# Altium PCB DT10966_MOTOR_CONTROLLER.PcbDoc (part 2 of 8)
Units mm, origin at the board's own origin, x right, y up, seen from the top; angles counter-clockwise.
Board outline 300 x 19 mm, 10 copper layers (Top Layer, Layer 2 GND, Layer 3 SIG, Layer 4 GND, Layer 5 PWR, Layer 6 PWR, Layer 7 GND, Layer 8 SIG, Layer 9 GND, Bottom Layer), stack 2.418 mm thick; 745 components, 446 nets, 2132 pads, 1222 vias.
Unrouted connection lines stored in the file: 3.
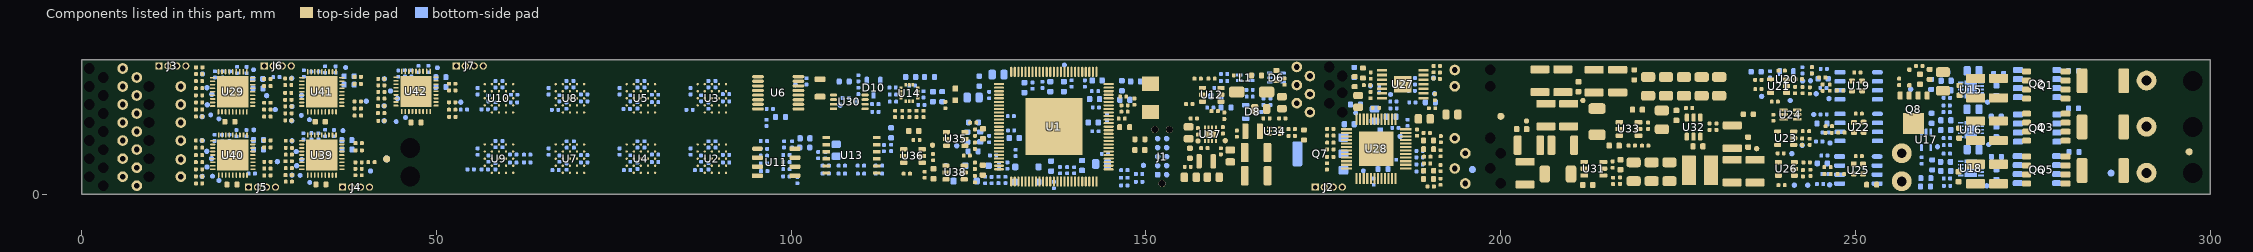
[diagram p10: the components of this part, seen from the top]

## Components (designator, comment, footprint, x,y, rotation, side; value= is the part's Value field where it differs from the comment) (continued)
TP9 "Test Point" TP_D0.75mm 243.641,16.009 r0 bottom
TP10 "Test Point" TP_D0.75mm 246.236,13.494 r90 bottom
TP11 "Test Point" TP_D0.75mm 242.528,15.974 r0 bottom
TP12 "Test Point" TP_D0.75mm 236.753,13.805 r0 bottom
TP13 "Test Point" TP_D0.75mm 244.096,11.257 r270 bottom
TP14 "Test Point" TP_D0.75mm 240.784,13.229 r270 bottom
TP15 "Test Point" TP_D0.75mm 246.377,7.227 r90 bottom
TP16 "Test Point" TP_D0.75mm 242.472,6.913 r270 bottom
TP17 "Test Point" TP_D0.75mm 241.013,5.741 r0 bottom
TP18 "Test Point" TP_D0.75mm 243.24,1.289 r270 bottom
TP19 "Test Point" TP_D0.75mm 246.34,1.348 r90 bottom
TP20 "Test Point" TP_D0.75mm 241.366,1.296 r270 bottom
TP21 "Test Point" TP_D0.75mm 190.517,16.387 r180 bottom
TP22 "Test Point" TP_D0.75mm 190.66,14.183 r180 bottom
TP23 "Test Point" TP_D1.5mm 184.465,14.074 r90 bottom
TP24 "Test Point" TP_D0.75mm 185.817,8.17 r90 bottom
TP27 "Test Point" TP_D0.75mm 181.627,15.312 r90 bottom
TP28 "Test Point" TP_D1.5mm 24.246,17.562 r180 bottom
TP29 "Test Point" TP_D0.75mm 18.357,14.091 r180 bottom
TP30 "Test Point" TP_D0.75mm 17.673,15.034 r180 bottom
TP31 "Test Point" TP_D0.75mm 17,10.958 r180 bottom
TP32 "Test Point" TP_D0.75mm 17.72,12.624 r180 bottom
TP35 "Test Point" TP_D0.75mm 17.041,16.958 r180 bottom
TP36 "Test Point" TP_D1.5mm 18.203,11.204 r180 bottom
TP37 "Test Point" TP_D1.5mm 19.359,10.639 r180 bottom
TP38 "Test Point" TP_D0.75mm 109.189,13.056 r90 bottom
TP39 "Test Point" TP_D0.75mm 106.913,12.575 r90 bottom
TP40 "Test Point" TP_D0.75mm 257.757,14.807 r270 bottom
TP41 "Test Point" TP_D0.75mm 203.621,10.342 r270 top
TP42 "Test Point" TP_D0.75mm 236.05,6.445 r90 top
TP43 "Test Point" TP_D0.75mm 211.56,13.228 r270 top
TP44 "Test Point" TP_D0.75mm 161.171,7.574 r90 top
TP45 "Test Point" TP_D0.75mm 123.327,6.843 r90 bottom
TP46 "Test Point" TP_D0.75mm 119.924,6.933 r90 top
TP47 "Test Point" TP_D0.75mm 157.335,7.521 r180 top
TP48 "Test Point" TP_D0.75mm 121.802,4.049 r90 bottom
TP49 "Test Point" TP_D1.5mm 36.834,8.982 r180 bottom
TP50 "Test Point" TP_D0.75mm 31.037,4.917 r180 bottom
TP51 "Test Point" TP_D0.75mm 30.26,6.032 r180 bottom
TP52 "Test Point" TP_D0.75mm 29.658,2.712 r180 bottom
TP53 "Test Point" TP_D0.75mm 30.306,4.037 r180 bottom
TP56 "Test Point" TP_D0.75mm 29.653,7.555 r180 bottom
TP57 "Test Point" TP_D1.5mm 30.797,2.674 r180 bottom
TP58 "Test Point" TP_D1.5mm 32.154,1.687 r180 bottom
TP59 "Test Point" TP_D0.75mm 166.549,14.662 r270 bottom
TP60 "Test Point" TP_D1.5mm 24.269,9.092 r0 bottom
TP61 "Test Point" TP_D0.75mm 18.325,5.041 r0 bottom
TP62 "Test Point" TP_D0.75mm 17.644,6.07 r0 bottom
TP63 "Test Point" TP_D0.75mm 16.991,2.533 r0 bottom
TP64 "Test Point" TP_D0.75mm 17.673,3.868 r0 bottom
TP67 "Test Point" TP_D0.75mm 17.004,7.581 r0 bottom
TP68 "Test Point" TP_D1.5mm 18.462,2.565 r0 bottom
TP69 "Test Point" TP_D1.5mm 19.36,1.946 r0 bottom
TP70 "Test Point" TP_D1.5mm 37.21,17.886 r180 bottom
TP71 "Test Point" TP_D0.75mm 31.003,13.961 r180 bottom
TP72 "Test Point" TP_D0.75mm 26.077,13.916 r180 bottom
TP73 "Test Point" TP_D0.75mm 29.61,10.379 r180 bottom
TP74 "Test Point" TP_D0.75mm 29.658,12.382 r180 bottom
TP77 "Test Point" TP_D0.75mm 29.61,16.363 r180 bottom
TP78 "Test Point" TP_D1.5mm 30.964,11.14 r180 bottom
TP79 "Test Point" TP_D1.5mm 32.11,10.527 r180 bottom
TP80 "Test Point" TP_D1.5mm 50.138,17.842 r180 bottom
TP81 "Test Point" TP_D0.75mm 44.525,13.507 r180 bottom
TP82 "Test Point" TP_D0.75mm 43.546,14.562 r180 bottom
TP83 "Test Point" TP_D0.75mm 42.643,10.367 r180 bottom
TP84 "Test Point" TP_D0.75mm 42.643,12.469 r180 bottom
TP87 "Test Point" TP_D0.75mm 42.67,16.275 r180 bottom
TP88 "Test Point" TP_D1.5mm 44.339,10.25 r180 bottom
TP89 "Test Point" TP_D1.5mm 45.646,10.827 r180 bottom
TP90 "Test Point" TP_D1.5mm 180.618,3.313 r90 bottom
TP91 "Test Point" TP_D1.5mm 179.544,11.478 r90 bottom
TP92 "Test Point" TP_D0.75mm 27.295,11.949 r180 bottom
TP93 "Test Point" TP_D0.75mm 40.724,3.297 r180 bottom
TP94 "Test Point" TP_D0.75mm 27.59,4.614 r0 bottom
TP95 "Test Point" TP_D0.75mm 40.126,13.135 r180 bottom
TP96 "Test Point" TP_D0.75mm 53.44,12.997 r180 bottom
U1 "TMS320F28377S-Q1" "100-HTQFP (14x14)" 137.011,9.537 r0 top
U2 "MT25QL01GBBB8E12-0AUT" "24-T-PBGA (6X8)" 88.821,5.038 r90 top
U3 "MT25QL01GBBB8E12-0AUT" "24-T-PBGA (6X8)" 88.821,13.537 r90 top
U4 "MT25QL01GBBB8E12-0AUT" "24-T-PBGA (6X8)" 78.821,5.037 r90 top
U5 "MT25QL01GBBB8E12-0AUT" "24-T-PBGA (6X8)" 78.821,13.537 r90 top
U6 "SN74LVC138AMPWTEP" TSSOP16 98.171,14.312 r180 top
U7 "MT25QL01GBBB8E12-0AUT" "24-T-PBGA (6X8)" 68.821,5.037 r90 top
U8 "MT25QL01GBBB8E12-0AUT" "24-T-PBGA (6X8)" 68.821,13.537 r90 top
U9 "MT25QL01GBBB8E12-0AUT" "24-T-PBGA (6X8)" 58.821,5.037 r90 top
U10 "MT25QL01GBBB8E12-0AUT" "24-T-PBGA (6X8)" 58.821,13.537 r90 top
U11 "25LC256-H/SN" SOIC8P127_490X600X175L70X41 97.871,4.537 r0 top
U12 "TMP127EDBVRQ1" SOT-23-6 159.268,14.033 r0 top
U13 "SCA3100-D07-1" SCA3100-D07-1 108.515,5.503 r0 top
U14 "ADXL382-2BCCZ-RL7" "14-LGA (2.9X2.8)" 116.653,14.285 r0 top
U15 "A89500KEJSR" A89500KEJSR 266.227,14.774 r180 bottom
U16 "A89500KEJSR" A89500KEJSR 266.227,9.102 r180 bottom
U17 "SN74LVC1G02DCKR" DCK0005A_N 259.929,7.695 r270 bottom
U18 "A89500KEJSR" A89500KEJSR 266.227,3.666 r180 bottom
U19 "INA240A1EDRQ1" SOIC8P127_490X600X175L70X41 250.426,15.302 r180 bottom
U20 "REF 3.3V" SOT-23 240.271,16.233 r270 bottom
U21 "TLV3201AIDBVR" SOP5P95_290X280X145L45X40 239.144,15.253 r180 top
U22 "INA240A1EDRQ1" SOIC8P127_490X600X175L70X41 250.439,9.438 r180 bottom
U23 "TLV3201AIDBVR" SOP5P95_290X280X145L45X40 240.145,7.919 r180 top
U24 "SN74LVC1G332DCKR" SC70-6 239.843,11.889 r0 top
U25 "INA240A1EDRQ1" SOIC8P127_490X600X175L70X41 250.396,3.429 r180 bottom
U26 "TLV3201AIDBVR" SOP5P95_290X280X145L45X40 240.236,3.589 r180 top
U27 "ALM2403QPWPRQ1" 14-HTSSOP 186.174,15.52 r0 top
U28 "PGA970QPHPR" "48-HTQFP (7x7)" 182.432,6.42 r180 top
U29 "PGA900ARHHR" 36VQFN 21.295,14.449 r270 top
U30 "PCA8565TS/1,118" MINISOIC-8 108.188,13.034 r0 top
U31 "LMR51635XDDCR" DDC0006A-MFG 213.102,3.624 r180 top
U32 "LMR51635XDDCR" DDC0006A-MFG 227.165,9.487 r270 top
U33 "LMR51635XDDCR" DDC0006A-MFG 218.048,9.214 r180 top
U34 "TPS564247DRLR" SOT5x3-6_DRL_TEX 168.152,8.908 r0 top
U35 "OPA320SAIDBVR" SOT-23-6 123.182,7.808 r0 top
U36 "REF35300QDBVRQ1" SOT23-6_DBV_TEX 117.171,5.409 r0 top
U37 "TPS62080ADSGR" "WSON (8) 2*2mm" 159.085,8.471 r270 top
U38 "OPA320SAIDBVR" SOT-23-6 123.096,3.084 r0 top
U39 "PGA900ARHHR" 36VQFN 33.862,5.537 r270 top
U40 "PGA900ARHHR" 36VQFN 21.321,5.537 r270 top
U41 "PGA900ARHHR" 36VQFN 33.862,14.449 r270 top
U42 "PGA900ARHHR" 36VQFN 47.13,14.515 r270 top
X1 "PIN-TH-0.6mm" PIN-TH-0.6mm#1 193.5,17.528 r0 top
X2 "PIN-TH-0.6mm" PIN-TH-0.6mm#1 193.5,15.226 r0 top
X3 "PIN-TH-0.6mm" PIN-TH-0.6mm#2 193.5,1.528 r0 top
X4 "PIN-TH-0.6mm" PIN-TH-0.6mm#1 193.5,3.653 r0 top
X5 "PIN-TH-0.6mm" PIN-TH-0.6mm#2 193.5,5.778 r0 top
X6 "PIN-TH-0.6mm" PIN-TH-0.6mm#1 193.5,7.903 r0 top
X7 "PIN-TH-0.6mm" PIN-TH-0.6mm#1 171.253,17.955 r90 top
X8 "PIN-TH-0.6mm" PIN-TH-0.6mm#1 171.253,15.401 r90 top
X9 "PIN-TH-0.6mm" PIN-TH-0.6mm#1 171.253,12.861 r90 top
X10 "PIN-TH-0.6mm" PIN-TH-0.6mm#1 173.1,11.591 r180 top
X11 "PIN-TH-0.6mm" PIN-TH-0.6mm#1 5.79,15.201 r0 top
X12 "PIN-TH-0.6mm" PIN-TH-0.6mm#1 5.79,17.741 r90 top
X13 "PIN-TH-0.6mm" PIN-TH-0.6mm#1 5.79,10.121 r90 top
X14 "PIN-TH-0.6mm" PIN-TH-0.6mm#1 5.79,12.661 r90 top
X15 "PIN-TH-0.6mm" PIN-TH-0.6mm#1 5.79,5.041 r90 top
X16 "PIN-TH-0.6mm" PIN-TH-0.6mm#3 5.79,8.125 r90 top
X17 "PIN-TH-0.6mm" PIN-TH-0.6mm#1 14,4.913 r90 top
X18 "PIN-TH-0.6mm" PIN-TH-0.6mm#1 5.79,2.501 r90 top
X19 "PIN-TH-0.6mm" PIN-TH-0.6mm#1 7.79,13.931 r90 top
X20 "PIN-TH-0.6mm" PIN-TH-0.6mm#1 7.79,16.471 r90 top
X21 "PIN-TH-0.6mm" PIN-TH-0.6mm#1 7.79,8.851 r90 top
X22 "PIN-TH-0.6mm" PIN-TH-0.6mm#1 7.79,11.391 r90 top
X23 "PIN-TH-0.6mm" PIN-TH-0.6mm#1 7.79,3.771 r90 top
X24 "PIN-TH-0.6mm" PIN-TH-0.6mm#1 7.79,6.311 r90 top
X25 "PIN-TH-0.6mm" PIN-TH-0.6mm#4 14,2.391 r90 top
X26 "PIN-TH-0.6mm" PIN-TH-0.6mm#1 7.79,1.231 r90 top
X27 "PIN-TH-0.6mm" PIN-TH-0.6mm#1 14,12.661 r90 top
X28 "PIN-TH-0.6mm" PIN-TH-0.6mm#1 14,15.201 r90 top
X29 "PIN-TH-0.6mm" PIN-TH-0.6mm#1 14,7.581 r90 top
X30 "PIN-TH-0.6mm" PIN-TH-0.6mm#1 14,10.121 r90 top
X31 "PinTH_0.9mm" PIN-TH-0.9mm#1 256.5,5.793 r0 bottom
X32 "PinTH_0.9mm" PIN-TH-0.9mm#1 256.5,1.844 r270 bottom
X33 "PinTH_0.9mm" PIN-TH-0.9mm#2 291,16.037 r90 top
X34 "PinTH_0.9mm" PIN-TH-0.9mm#2 291,9.537 r90 top
X35 "PinTH_0.9mm" PIN-TH-0.9mm#2 291,3.037 r90 top
X36 "PIN-TH-0.6mm" PIN-TH-0.6mm#1 173.1,16.671 r90 top
X37 "PIN-TH-0.6mm" PIN-TH-0.6mm#1 173.1,14.131 r90 top
Y1 "20MHz" NX5032GA 150.637,13.587 r90 top
Y2 "ABS07AIG-32.768KHZ-9-1-T" XTALDFN2_320X150X85L75X150 104.07,15.005 r270 top
Z1 "Fiducial" REPER1.2 200,11 r0 top
Z2 "Fiducial" REPER1.2 297,6 r0 top
Z3 "Fiducial" REPER1.2 43,5 r0 top
Z4 "Fiducial" REPER1.2 196,3.5 r180 bottom
Z5 "Fiducial" REPER1.2 43,5 r180 bottom
Z6 "Fiducial" REPER1.2 286,3 r180 bottom

## Footprints (in the part's own frame and the unit in brackets; to place one, negate y for a bottom-side part, rotate by r counter-clockwise, add the part's x,y. Pads: shape width x height; smd on the part's side, far side on the other; paste and mask are expansions set on the pad)
14-HTSSOP [mil]
  rect 55.42x14 smd paste+0 mask+1.97: 1(-116.21,76.77) 2(-116.21,51.18) 3(-116.21,25.59) 4(-116.21,0) 5(-116.21,-25.59) 6(-116.21,-51.18) 7(-116.21,-76.77) 8(116.21,-76.77) 9(116.21,-51.18) 10(116.21,-25.59) 11(116.21,0) 12(116.21,25.59) 13(116.21,51.18) 14(116.21,76.77)
  rect 97x91 smd paste+0 mask+1.97: 15(0,0)
  silkscreen extent -136,-106 93,110, body extent -130,-101 130,101, height 47
"14-LGA (2.9X2.8)" [mil] "ADXL382-2BCCZ-RL7"
  rect 18x13 smd paste+0 mask+0: 1(-46,29.53) 2(-46,9.84) 3(-46,-9.84) 4(-46,-29.53) 8(46,-29.53) 9(46,-9.84) 10(46,9.84) 11(46,29.53)
  rect 13x18 smd paste+0 mask+0: 5(-19.69,-46) 6(0,-46) 7(19.68,-46) 12(19.68,46) 13(0,46) 14(-19.69,46)
  silkscreen extent -84,-64 64,64, body extent -59,-59 59,59, height 38
"24-T-PBGA (6X8)" [mil]
  round 13 smd paste+0 mask+1.97: A2(-39.37,78.74) A3(0,78.74) A4(39.37,78.74) A5(78.74,78.74) B1(-78.74,39.37) B2(-39.37,39.37) B3(0,39.37) B4(39.37,39.37) B5(78.74,39.37) C1(-78.74,0) C2(-39.37,0) C3(0,0) C4(39.37,0) C5(78.74,0) D1(-78.74,-39.37) D2(-39.37,-39.37) D3(0,-39.37) D4(39.37,-39.37) D5(78.74,-39.37) E1(-78.74,-78.74) E2(-39.37,-78.74) E3(0,-78.74) E4(39.37,-78.74) E5(78.74,-78.74)
  silkscreen extent -130,-170 130,170, body extent -120,-159 120,159, height 47
36VQFN [mm] "PGA900ARHHR"
  oval 0.75x0.24 smd paste+0 mask+0.051: 1(-2.825,2) 2(-2.825,1.5) 3(-2.825,1) 4(-2.825,0.5) 5(-2.825,0) 6(-2.825,-0.5) 7(-2.825,-1) 8(-2.825,-1.5) 9(-2.825,-2) 19(2.825,-2) 20(2.825,-1.5) 21(2.825,-1) 22(2.825,-0.5) 23(2.825,0) 24(2.825,0.5) 25(2.825,1) 26(2.825,1.5) 27(2.825,2)
  oval 0.24x0.75 smd paste+0 mask+0.051: 10(-2,-2.825) 11(-1.5,-2.825) 12(-1,-2.825) 13(-0.5,-2.825) 14(0,-2.825) 15(0.5,-2.825) 16(1,-2.825) 17(1.5,-2.825) 18(2,-2.825) 28(2,2.825) 29(1.5,2.825) 30(1,2.825) 31(0.5,2.825) 32(0,2.825) 33(-0.5,2.825) 34(-1,2.825) 35(-1.5,2.825) 36(-2,2.825)
  rect 4.4x4.4 smd paste-2.187 mask+0.051: 37(0,0)
  silkscreen extent -3.91,-3.2 3.2,3.2, body extent -3,-3 3,3, height 1
"48-HTQFP (7x7)" [mm]
  rect 1.57x0.3 smd paste-0.04: 1(-4.17,2.75) 2(-4.17,2.25) 3(-4.17,1.75) 4(-4.17,1.25) 5(-4.17,0.75) 6(-4.17,0.25) 7(-4.17,-0.25) 8(-4.17,-0.75) 9(-4.17,-1.25) 10(-4.17,-1.75) 11(-4.17,-2.25) 12(-4.17,-2.75) 25(4.17,-2.75) 26(4.17,-2.25) 27(4.17,-1.75) 28(4.17,-1.25) 29(4.17,-0.75) 30(4.17,-0.25) 31(4.17,0.25) 32(4.17,0.75) 33(4.17,1.25) 34(4.17,1.75) 35(4.17,2.25) 36(4.17,2.75)
  rect 0.3x1.57 smd paste-0.04: 13(-2.75,-4.17) 14(-2.25,-4.17) 15(-1.75,-4.17) 16(-1.25,-4.17) 17(-0.75,-4.17) 18(-0.25,-4.17) 19(0.25,-4.17) 20(0.75,-4.17) 21(1.25,-4.17) 22(1.75,-4.17) 23(2.25,-4.17) 24(2.75,-4.17) 37(2.75,4.17) 38(2.25,4.17) 39(1.75,4.17) 40(1.25,4.17) 41(0.75,4.17) 42(0.25,4.17) 43(-0.25,4.17) 44(-0.75,4.17) 45(-1.25,4.17) 46(-1.75,4.17) 47(-2.25,4.17) 48(-2.75,4.17)
  rect 4.902x4.902 smd paste-5 mask+0.05: 49(0,0)
  silkscreen extent -4.7,-3.5 3.5,3.6, body extent -4.5,-4.5 4.5,4.5, height 1.2
"100-HTQFP (14x14)" [mm]
  oval 1.45x0.3 smd paste+0 mask+0.03: 1(-7.725,6) 2(-7.725,5.5) 3(-7.725,5) 4(-7.725,4.5) 5(-7.725,4) 6(-7.725,3.5) 7(-7.725,3) 8(-7.725,2.5) 9(-7.725,2) 10(-7.725,1.5) 11(-7.725,1) 12(-7.725,0.5) 13(-7.725,0) 14(-7.725,-0.5) 15(-7.725,-1) 16(-7.725,-1.5) 17(-7.725,-2) 18(-7.725,-2.5) 19(-7.725,-3) 20(-7.725,-3.5) 21(-7.725,-4) 22(-7.725,-4.5) 23(-7.725,-5) 24(-7.725,-5.5) 25(-7.725,-6) 51(7.725,-6) 52(7.725,-5.5) 53(7.725,-5) 54(7.725,-4.5) 55(7.725,-4) 56(7.725,-3.5) 57(7.725,-3) 58(7.725,-2.5) 59(7.725,-2) 60(7.725,-1.5) 61(7.725,-1) 62(7.725,-0.5) 63(7.725,0) 64(7.725,0.5) 65(7.725,1) 66(7.725,1.5) 67(7.725,2) 68(7.725,2.5) 69(7.725,3) 70(7.725,3.5) 71(7.725,4) 72(7.725,4.5) 73(7.725,5) 74(7.725,5.5) 75(7.725,6)
  oval 0.3x1.45 smd paste+0 mask+0.03: 26(-6,-7.725) 27(-5.5,-7.725) 28(-5,-7.725) 29(-4.5,-7.725) 30(-4,-7.725) 31(-3.5,-7.725) 32(-3,-7.725) 33(-2.5,-7.725) 34(-2,-7.725) 35(-1.5,-7.725) 36(-1,-7.725) 37(-0.5,-7.725) 38(0,-7.725) 39(0.5,-7.725) 40(1,-7.725) 41(1.5,-7.725) 42(2,-7.725) 43(2.5,-7.725) 44(3,-7.725) 45(3.5,-7.725) 46(4,-7.725) 47(4.5,-7.725) 48(5,-7.725) 49(5.5,-7.725) 50(6,-7.725) 76(6,7.725) 77(5.5,7.725) 78(5,7.725) 79(4.5,7.725) 80(4,7.725) 81(3.5,7.725) 82(3,7.725) 83(2.5,7.725) 84(2,7.725) 85(1.5,7.725) 86(1,7.725) 87(0.5,7.725) 88(0,7.725) 89(-0.5,7.725) 90(-1,7.725) 91(-1.5,7.725) 92(-2,7.725) 93(-2.5,7.725) 94(-3,7.725) 95(-3.5,7.725) 96(-4,7.725) 97(-4.5,7.725) 98(-5,7.725) 99(-5.5,7.725) 100(-6,7.725)
  rect 8.045x8.045 smd paste-10 mask+0.051: 101(0,0)
  silkscreen extent -7.13,-7.15 7.15,7.12, body extent -8.02,-8.02 8.02,8.02, height 1.1
A89500KEJSR [mil]
  rect 32x10 smd paste+0 mask+0: 1(-56,39.37) 2(-56,19.69) 3(-56,0) 4(-56,-19.68) 5(-56,-39.37) 6(56,-39.37) 7(56,-19.68) 8(56,0) 9(56,19.69) 10(56,39.37)
  rect 69x98 smd paste+0 mask+0: 11(0,0)
  silkscreen extent -98,-65 65,65, body extent -60,-60 60,60, height 32
APT1608SECJ3AMT [mm]
  rrect15% 0.8x0.8 smd: 1(-0.825,0) 2(0.825,0)
  silkscreen extent -1.55,-0.3 0.18,0.3, body extent -0.8,-0.4 0.81,0.4, height 0.75
BEADC160X80X95L40 [mm] "EIA 0603 (1608) 1.60x0.80x0.95 Ferrite Bead"
  rrect50% 0.72x0.83 smd: 1(-0.705,0) 2(0.705,0)
  silkscreen extent -0.15,-0.45 0.15,0.45, body extent -0.8,-0.4 0.8,0.4, height 0.95
BOURNS_SRP4020TA [mm] "Inductor 4.45x4.06 h2.00 Bourns Inc."
  rrect50% 1.5x2.4 smd paste-1: 1(-1.85,0) 2(1.85,0)
  silkscreen extent -2.1,-2.1 2.1,2.1, body extent -2.2,-2.1 2.2,2.1, height 1.91
CAPC100x50x50L25 [mm] "EIA 0402 (1005) T0.50 1.00x0.50x0.50"
  rrect50% 0.52x0.56 smd: 1(-0.44,0) 2(0.44,0)
  body extent -0.52,-0.28 0.52,0.27, height 0.55
CAPC160X80X90L35 [mm] "EIA 0603 (1608) T0.90 1.60x0.80x0.90"
  rrect50% 0.77x0.87 smd: 1(-0.7,0) 2(0.7,0)
  silkscreen extent -0.1,-0.4 0.1,0.4, body extent -0.88,-0.48 0.87,0.47, height 0.9
CAPC200X125X145L50 [mm] "EIA 0805 (2012) T1.45 2.00x1.25x1.45"
  rrect50% 1.04x1.37 smd: 1(-0.84,0) 2(0.84,0)
  silkscreen extent -0.1,-0.63 0.1,0.63, body extent -1,-0.63 1,0.63, height 1.45
CAPC320X250X250L60 [mm] "EIA 1210 (3225) T2.50 3.20x2.50x2.50"
  rrect25% 1.3x2.7 smd paste-2539.97: 1(-1.37,0) 2(1.37,0)
  silkscreen extent -0.4,-1.25 0.4,1.25, body extent -1.6,-1.25 1.6,1.25, height 2.8
CAPC3216X180N [mm]
  rrect50% 1.38x2.01 smd: 1(-1.32,0) 2(1.32,0)
  silkscreen extent -0.43,-0.95 0.42,0.95, body extent -1.6,-0.8 1.6,0.8, height 1.8
CAPC3225_GCM32ER71E106KA57L [mm]
  rrect30% 1.1x2.7 smd: 1(-1.6,0) 2(1.6,0)
  silkscreen extent -0.75,-1.4 0.75,1.4, body extent -1.6,-1.25 1.6,1.25, height 2.52
CONN__TAG_TC2050-IDC-NL [mm]
  rrect50% 0.787x0.787 smd paste-1: 1(0,0)
  round 0.787 smd paste-1: 2(0,-1.27) 3(0,-2.54) 4(0,-3.81) 5(0,-5.08) 6(1.27,-5.08) 7(1.27,-3.81) 8(1.27,-2.54) 9(1.27,-1.27) 10(1.27,0)
  round 0.991 hole 0.991 unplated: ""(-0.38,-6.35) ""(0.635,1.27) ""(1.65,-6.35)
  silkscreen extent -1.4,-7.29 2.41,2.24
DCK0005A_N [mm]
  rrect30% 0.95x0.4 smd mask+0: 1(-1.1,0.65) 2(-1.1,0) 3(-1.1,-0.65)
  rrect30% 0.95x0.4 smd: 4(1.1,-0.65) 5(1.1,0.65)
  silkscreen extent -1.45,-1.02 0.5,1.52, body extent -1.05,-1 1.05,1, height 1.1
DDC0006A-MFG [mm]
  rrect45% 1.1x0.6 smd: 1(-1.35,0.95) 2(-1.35,0) 3(-1.35,-0.95) 4(1.35,-0.95) 5(1.35,0) 6(1.35,0.95)
  silkscreen extent -1.53,-1.53 0.42,1.82, body extent -1.44,-1.45 1.44,1.45, height 0.95
DIOM520X260X290XL115X145 [mm] "SMA (JEDEC DO-214AC)"
  rrect50% 2.2x1.56 smd: 1(-2.1,0) 2(2.1,0)
  silkscreen extent -2.15,-1.3 0,1.3, body extent -2.75,-1.4 2.75,1.4, height 2.6
DLW21HN900SQ2L [mm]
  rect 0.9x0.4 smd paste-1 mask+0.05: 1(-0.85,-0.4) 2(0.85,-0.4) 3(0.85,0.4) 4(-0.85,0.4)
  silkscreen extent -1.95,-0.92 1,0.92, body extent -1,-0.6 1,0.6, height 1
IND_DFE2HCAH1R0MJ0L [mm]
  rrect30% 0.85x2.2 smd: 1(-1.025,0) 2(1.025,0)
  silkscreen extent -0.32,-1.13 0.33,1.12, body extent -1.25,-1 1.25,1, height 1.2
IND_SRR4828A180M [mm]
  rrect10% 4.2x1.98 smd: 1(0,1.575) 2(0,-1.575)
  silkscreen extent -2.5,-2.4 2.4,2.9, body extent -2.4,-2.41 2.4,2.41, height 2.8
INDC250X200X120L60 [mm] "EIA 1008 (2520) T1.20 2.50x2.00x1.20 Chip Inductor"
  rrect50% 0.8x2 smd: 1(-1,0) 2(1,0)
  silkscreen extent -0.33,-1 0.33,1, body extent -1.25,-1 1.25,1, height 1.2
M50-3530442 [mm]
  rect 1.01x1.01 hole 0.66 mask+0.06: 1(-1.905,0)
  round 1.01 hole 0.66 mask+0.06: 2(-0.635,0) 3(0.635,0) 4(1.905,0)
  silkscreen extent -2.54,-0.99 2.54,1.47, body extent -2.53,-1.06 2.55,1.04, height 4.02
MINISOIC-8 [mm] "MINISOIC, 8-Leads, Body 3,00x3,00mm, Pitch 0,65mm, IPC Medium Density"
  oval 1.04x0.38 smd mask+0.05: 1(-2.225,0.975) 2(-2.225,0.325) 3(-2.225,-0.325) 4(-2.225,-0.975) 5(2.225,-0.975) 6(2.225,-0.325) 7(2.225,0.325) 8(2.225,0.975)
  silkscreen extent -2.35,-1.55 1.15,1.84, body extent -2.45,-1.55 2.45,1.55, height 1.1
NX5032GA [mm]
  rect 2x2.4 smd: 1(-2,0) 2(2,0)
  silkscreen extent -2.5,-1.6 2.5,1.6, body extent -2.5,-1.6 2.5,1.6, height 1.5
PIN-TH-0.6mm#1 [mm]
  round 1.5 hole 0.8: 1(0,0)
PIN-TH-0.6mm#2 [mm]
  round 1.5 hole 0.8: 1(1.5,0)
PIN-TH-0.6mm#3 [mm]
  round 1.5 hole 0.8: 1(-0.544,0)
PIN-TH-0.6mm#4 [mm]
  round 1.5 hole 0.8: 1(0.11,0)
PIN-TH-0.9mm#1 [mm]
  round 2.8 / inner round 2 / far side round 2.8 hole 1.4: 1(0,0)
PIN-TH-0.9mm#2 [mm]
  round 2.8 hole 1.4: 1(0,0)
"POWERPAK SO-8L_VIS" [mm]
  rrect20% 0.68x1.1 smd paste+0 mask+0: 1(-1.905,-2.715) 2(-0.635,-2.715) 3(0.635,-2.715) 4(1.905,-2.715)
  rect 3x3 smd paste+0 mask+0: 5(0,1.219)
  rect 0.127x0.127 smd paste-0.064 mask-0.064: 5(0,0.621)
  Top Layer region: 2.502,3.125 -2.502,3.125 -2.502,2.615 -2.032,2.615 -2.032,0.303 -2.627,0.303 -2.627,-0.307 -2.032,-0.307 -2.032,-1.017 2.032,-1.017 2.032,-0.307 2.627,-0.307 2.627,0.303 2.032,0.303 2.032,2.615 2.502,2.615
  silkscreen extent -2.63,-4.08 2.63,2.31, body extent -2.55,-3.1 2.55,3.06, height 1.17
RC0402N_PAN [mm]
  rrect50% 0.55x0.56 smd: 1(-0.45,0) 2(0.45,0)
  body extent -0.53,-0.25 0.53,0.25, height 0.71
RC_CRA2512_BOURNS [mm]
  rrect30% 1.5x3.5 smd: 1(-2.934,0) 2(2.934,0)
  silkscreen extent -1.98,-1.89 1.98,1.89, body extent -3.33,-1.77 3.33,1.77, height 0.91
REPER1.2 [mm]
  round 1 smd paste-25.4 mask+0.6: 1(0,0)
RESC100X50X40L25 [mm] "EIA 0402 (1005) T0.40 1.00x0.50x0.40"
  rrect50% 0.55x0.56 smd: 1(-0.45,0) 2(0.45,0)
  body extent -0.5,-0.25 0.5,0.25, height 0.35
RESC160X80X55L30 [mm] "EIA 0603 (1608) T0.55 1.60x0.80x0.55"
  rrect50% 0.72x0.83 smd: 1(-0.705,0) 2(0.705,0)
  silkscreen extent -0.15,-0.45 0.15,0.45, body extent -0.77,-0.42 0.78,0.43, height 0.45
SC70-6 [mm]
  rrect50% 1.2x0.4 smd mask+0: 1(1.9,-1.3) 2(1.9,-0.65) 3(1.9,0) 4(0,0) 5(0,-0.65) 6(0,-1.3)
  silkscreen extent -0.82,-1.92 3.52,0.62, body extent -0.12,-1.65 1.98,0.35, height 1.1
SCA3100-D07-1 [mil] "12-SMD"
  rect 43x18 smd paste+0 mask+1.97: 1(-140,98.43) 2(-140,59.06) 3(-140,19.68) 4(-140,-19.68) 5(-140,-59.06) 6(-140,-98.43) 7(140,-98.43) 8(140,-59.06) 9(140,-19.68) 10(140,19.68) 11(140,59.06) 12(140,98.43)
  silkscreen extent -189,-174 143,174, body extent -149,-169 149,169, height 130
SOD250X125X110L30X40 [mm] "NXP SOD323, JEITA SC-76 2.5x1.25x1.1mm"
  rrect50% 0.6x0.6 smd: 1(-1.1,0) 2(1.1,0)
  silkscreen extent -1.49,-0.8 0.9,0.9, body extent -1.35,-0.62 1.35,0.63, height 1.1
SOD365X155X135L30X57 [mm] "Diodes Inc. SOD123 3.65x1.55x1.35mm"
  rrect50% 0.9x0.95 smd: 1(-1.64,0) 2(1.64,0)
  silkscreen extent -1.9,-0.75 0.75,1, body extent -1.92,-0.84 1.93,0.86, height 1.43
SOIC8P127_490X600X175L70X41 [mm] "SO-8 4.9X6X1.75 p1.27 (JEDEC MS-012-AA)"
  oval 1.55x0.64 smd: 1(-2.64,1.905)
  rrect50% 1.55x0.64 smd: 2(-2.64,0.635) 3(-2.64,-0.635) 4(-2.64,-1.905) 5(2.64,-1.905) 6(2.64,-0.635) 7(2.64,0.635) 8(2.64,1.905)
  silkscreen extent -2.9,-2.5 1.95,2.8, body extent -3.01,-2.45 3.01,2.45, height 1.63
SOP5P95_290X280X145L45X40 [mm] "TSOP5 2.9x1.6x1.45mm p0.95 (JEDEC MO-178AA) SOT-23-5"
  rrect50% 1x0.6 smd: 1(-1.13,0.95) 2(-1.13,0) 3(-1.13,-0.95) 4(1.13,-0.95) 5(1.13,0.95)
  silkscreen extent -1.6,-1.5 0.8,1.91, body extent -1.4,-1.45 1.4,1.45, height 1.45
SOP6P65_200X210X90L85X20 [mm] "Nexperia 2.00x2.10x0.90 p0.65 TSSOP6, SOT363, SC-88"
  rrect50% 0.8x0.4 smd mask+0.04: 1(-0.95,0.65) 2(-0.95,0) 3(-0.95,-0.65) 4(0.95,-0.65) 5(0.95,0) 6(0.95,0.65)
  silkscreen extent -0.97,-1.1 0.62,1.15, body extent -1.15,-1.05 1.15,1.05, height 1
SOT5x3-6_DRL_TEX [mm]
  rrect50% 0.7x0.3 smd: 1(-0.775,0.5) 2(-0.775,0) 3(-0.775,-0.5) 4(0.775,-0.5) 5(0.775,0) 6(0.775,0.5)
  silkscreen extent -1.47,-1.23 0.77,1.31, body extent -0.85,-1.1 0.85,1.11, height 0.61
SOT23-3P95_237X112L50X40 [mm] "SOT-23-3 2.90x1.30x1.10 p0.95 (JEDEC TO-236AB)"
  rrect50% 1.1x0.6 smd: 1(-1,0.95) 2(-1,-0.95) 3(1,0)
  silkscreen extent 0,-1.45 0.65,1.45, body extent -1.2,-1.45 1.2,1.45, height 0.91
SOT23-6_DBV_TEX [mm]
  rrect50% 1.1x0.6 smd: 1(-1.312,0.95) 2(-1.312,0) 3(-1.312,-0.95) 4(1.287,-0.95) 5(1.287,0) 6(1.287,0.95)
  silkscreen extent -1.67,-1.65 1,1.92, body extent -1.5,-1.52 1.5,1.52, height 1.45
SOT230P700X180-4N [mm]
  rrect30% 1.4x1.2 smd: 1(-3.25,2.3) 2(-3.25,0) 3(-3.25,-2.3)
  rrect30% 1.4x3.5 smd: 4(3.25,0)
  silkscreen extent -5.07,-3.25 1.75,3.25, body extent -3.5,-3.25 3.5,3.25, height 1.8
SOT-23 [mm]
  rrect50% 1.1x0.6 smd: 1(-1,0.95) 2(-1,-0.95) 3(1,0)
  silkscreen extent 0,-1.45 0.65,1.45, body extent -1.2,-1.45 1.2,1.45, height 0.91
SOT-23-6 [mil]
  rrect50% 40x24 smd: 1(-50.94,38) 2(-50.94,0) 3(-50.94,-38) 4(50.94,-38) 5(50.94,0) 6(50.94,38)
  silkscreen extent -84,-53 21,68, body extent -55,-57 55,57, height 57
TOSHIBA_2-5Q1A [mm] "PDFN-8 5.00x6.00 h0.83 p1.27 DSOP Advance"
  rrect50% 0.85x1.45 smd: 1(-1.905,-2.75) 2(-0.635,-2.75) 3(0.635,-2.75) 4(1.905,-2.75)
  rrect50% 0.85x1.27 smd paste-2539.97 mask+0.102: 5(1.905,2.725) 6(0.635,2.725) 7(-0.635,2.725) 8(-1.905,2.725)
  Top Layer region: -2.125,-1.325 2.125,-1.325 2.203,-1.309 2.27,-1.265 2.314,-1.198 2.33,-1.12 2.33,-1.12 2.33,3.175 2.315,3.252 2.271,3.316 2.207,3.36 2.13,3.375 2.13,3.375 1.68,3.375 1.603,3.36 1.539,3.316 1.495,3.252 1.48,3.175 1.48,3.175 1.48,2.525 1.465,2.448 1.421,2.384 1.357,2.34 1.28,2.325 1.28,2.325 1.26,2.325 1.183,2.34 1.119,2.384 1.075,2.448 1.06,2.525 1.06,2.525 1.06,3.175 1.045,3.252 1.001,3.316 0.937,3.36 0.86,3.375 0.86,3.375 0.41,3.375 0.333,3.36 0.269,3.316 0.225,3.252 0.21,3.175 0.21,3.175 0.21,2.525 0.195,2.448 0.151,2.384 0.087,2.34 0.01,2.325 0.01,2.325 -0.01,2.325 -0.087,2.34 -0.151,2.384 -0.195,2.448 -0.21,2.525 -0.21,2.525 -0.21,3.175 -0.225,3.252 -0.269,3.316 -0.333,3.36 -0.41,3.375 -0.41,3.375 -0.86,3.375 -0.937,3.36 -1.001,3.316 -1.045,3.252 -1.06,3.175 -1.06,3.175 -1.06,2.525 -1.075,2.448 -1.118,2.384 -1.183,2.34 -1.26,2.325 -1.26,2.325 -1.28,2.325 -1.356,2.34 -1.421,2.384 -1.465,2.448 -1.48,2.525 -1.48,2.525 -1.48,3.175 -1.495,3.252 -1.539,3.316 -1.603,3.36 -1.68,3.375 -1.68,3.375 -2.13,3.375 -2.207,3.36 -2.271,3.316 -2.315,3.252 -2.33,3.175 -2.33,3.175 -2.33,-1.12 -2.314,-1.198 -2.27,-1.265 -2.203,-1.309 -2.125,-1.325
  silkscreen extent -2.85,-3.2 2.6,2.5, body extent -2.65,-3 2.65,3, height 0.73
TP_D0.75mm [mm] "Testpoint"
  round 0.75 smd paste-0.75 mask+0: 1(0,0)
TP_D1.5mm [mm] "Testpoint"
  round 0.7 smd paste-2539.97: 1(0,0)
TSSOP16 [mm]
  oval 1.65x0.45 smd: 1(-2.85,2.275) 2(-2.85,1.625) 3(-2.85,0.975) 4(-2.85,0.325) 5(-2.85,-0.325) 6(-2.85,-0.975) 7(-2.85,-1.625) 8(-2.85,-2.275) 9(2.85,-2.275) 10(2.85,-1.625) 11(2.85,-0.975) 12(2.85,-0.325) 13(2.85,0.325) 14(2.85,0.975) 15(2.85,1.625) 16(2.85,2.275)
  silkscreen extent -3.53,-2.55 1.7,3.17, body extent -3.1,-2.55 3.15,2.55, height 1.2
"WSON (8) 2*2mm" [mm]
  rect 0.5x0.28 smd paste+0 mask+0.04: 1(-0.95,0.75) 2(-0.95,0.25) 3(-0.95,-0.25) 4(-0.95,-0.75) 5(0.95,-0.75) 6(0.95,-0.25) 7(0.95,0.25) 8(0.95,0.75)
  rect 0.9x1.6 smd paste-0.787 mask-0.787: 9(0,0)
  Top Layer region: 0,0.8 0,0.8 0,0.8 0,0.8 0,0.8 0,0.8 0,0.8 0,0.8
  Top Layer region: 0,-0.8 0,-0.8 0,-0.8 0,-0.8 0,-0.8 0,-0.8 0,-0.8 0,-0.8
  silkscreen extent -1.63,-1.18 0.53,1.18, body extent -1.05,-1.05 1.05,1.05, height 0.8
XTALDFN2_320X150X85L75X150 [mm] "Crystal 3.20x1.50x0.85mm DFN 2-SMD"
  rrect50% 0.81x1.55 smd: 1(-1.23,0) 2(1.23,0)
  silkscreen extent -0.4,-0.75 0.4,0.75, body extent -1.6,-0.75 1.6,0.75, height 0.85

## Part data
C1 C2: library part CMP-001-2042-2, "CAP CER 0402 12PF 50V ULTRA STAB", Capacitance=12pF, Dielectric=X8R, Manufacturer=KEMET, Op Temp max=150°C, Op Temp min=-55°C, Package="0402 (1005 Metric)", Ratings=AEC-Q200, Tolerance=5%, Voltage Rating=50V, ComponentLink1Description=Datasheet, ComponentLink1URL=https://search.kemet.com/component-documentation/download/specsheet/C0402C120J5HACAUTO, ComponentLink2Description=Mouser, ComponentLink2URL=https://eu.mouser.com/ProductDetail/KEMET/C0402C120J5HACAUTO?qs=j%252B1pi9TdxUZTSOjjZ2f5wA%3D%3D, ComponentLink3Description=Digikey, ComponentLink3URL=https://www.digikey.com/en/products/detail/kemet/C0402C120J5HACAUTO/7955501, Height max=550µm, Lead Spacing=0mm, Mounting Type=SM, MPN=C0402C120J5HACAUTO, Size="1.00mm x 0.50mm"
C3 C10 C11 C14 C15 C16 C29 C30 C31 C32 C33 C34 C35 C36 C37 C38 C39 C40 C42 C43 C44 C45 C46 C47 C48 C49 C50 C51 C52 C53 C55 C56 C59 C60 C61 C62 C64 C65 C81 C92 C93 C94 C95 C99 C101 C102 C103 C104 C108 C109 C110 C113 C117 C118 C119 C121 C124 C126 C133 C135 C136 C140 C141 C142 C144 C145 C146 C147 C148 C149 C150 C151 C152 C155 C156 C174 C182 C187 C190 C192 C195 C198 C200 C202 C203 C204 C206 C207 C208 C209 C210 C211 C212 C213 C214 C216 C217 C218 C219 C220 C221 C222 C223 C224 C226 C227 C228 C229 C230 C231 C232 C233 C234 C236 C237 C238 C239 C240 C241: library part CMP-001-1980-2, "CAP CER 0.1UF 50V X8L 0402", Capacitance=100nF, Dielectric=X8L, Manufacturer="Murata Electronics", Op Temp max=150°C, Op Temp min=-55°C, Package="0402 (1005 Metric)", Ratings=AEC-Q200, Tolerance=10%, Voltage Rating=50V, ComponentLink1Description=Datasheet, ComponentLink1URL=https://www.murata.com/en-us/products/productdetail?partno=GCM155L8EH104KE07%23, ComponentLink2Description=Mouser, ComponentLink2URL=https://eu.mouser.com/ProductDetail/Murata-Electronics/GCM155L8EH104KE07D?qs=1mbolxNpo8fQSHf0HYnZWw%3D%3D, ComponentLink3Description=Digikey, ComponentLink3URL=https://www.digikey.com/en/products/detail/murata-electronics/GCM155L8EH104KE07D/11618823, Height max=550µm, Lead Spacing=0mm, Mounting Type=SM, MPN=GCM155L8EH104KE07D, Size="1.00mm x 0.50mm"
C4 C5 C6 C7 C96 C100 C105 C111: library part CMP-001-2008-2, "CAP CER 2200PF 50V X8R 0402", Capacitance=2.2nF, Dielectric=X8R, Manufacturer="TDK Corporation", Op Temp max=150°C, Op Temp min=-55°C, Package="0402 (1005 Metric)", Ratings=AEC-Q200, Tolerance=10%, Voltage Rating=50V, ComponentLink1Description=Datasheet, ComponentLink1URL=https://product.tdk.com/en/search/capacitor/ceramic/mlcc/info?part_no=CGA2B2X8R1H222K050BA, ComponentLink2Description=Mouser, ComponentLink2URL=https://eu.mouser.com/ProductDetail/TDK/CGA2B2X8R1H222K050BA?qs=NRhsANhppD9e0pyGSMWEuA%3D%3D, ComponentLink3Description=Digikey, ComponentLink3URL=https://www.digikey.com/en/products/detail/tdk-corporation/CGA2B2X8R1H222K050BA/2443359, Height max=550µm, Lead Spacing=0mm, Mounting Type=SM, MPN=CGA2B2X8R1H222K050BA, Size="1.00mm x 0.50mm"
C8 C9 C12 C13 C17 C18 C19 C20 C21 C22 C23 C24 C25 C41 C188 C189 C199 C201: library part CMP-001-2044-2, "CAP CER 2.2UF 6.3V X8L 0603", Capacitance=2.2µF, Dielectric=X8L, Manufacturer="TDK Corporation", Op Temp max=150°C, Op Temp min=-55°C, Package="0603 (1608 Metric)", Ratings=-, Tolerance=10%, Voltage Rating=6.3V, ComponentLink1Description=Datasheet, ComponentLink1URL=https://product.tdk.com/en/search/capacitor/ceramic/mlcc/info?part_no=C1608X8L0J225K080AC, ComponentLink2Description=Mouser, ComponentLink2URL=https://eu.mouser.com/ProductDetail/TDK/C1608X8L0J225K080AC?qs=rrS6PyfT74dgREMaiAoT3Q%3D%3D, ComponentLink3Description=Digikey, ComponentLink3URL=https://www.digikey.com/en/products/detail/tdk-corporation/C1608X8L0J225K080AC/8343784, Height max=900µm, Lead Spacing=0mm, Mounting Type=SM, MPN=C1608X8L0J225K080AC, Size="1.60mm x 0.80mm"
C26 C27 C28 C58 C154 C181 C191 C193 C194 C196: library part CMP-001-1984-2, "CAP CER 10UF 10V X8L 0805", Capacitance=10µF, Dielectric=X8L, Manufacturer="TDK Corporation", Op Temp max=150°C, Op Temp min=-55°C, Package="0805 (2012 Metric)", Ratings=AEC-Q200, Tolerance=10%, Voltage Rating=10V, ComponentLink1Description=Datasheet, ComponentLink1URL=https://product.tdk.com/en/search/capacitor/ceramic/mlcc/info?part_no=CGA4J1X8L1A106K125AC, ComponentLink2Description=Mouser, ComponentLink2URL=https://eu.mouser.com/ProductDetail/TDK/CGA4J1X8L1A106K125AC?qs=gZXFycFWdANzH%252B2UvJJjtQ%3D%3D, ComponentLink3Description=Digikey, ComponentLink3URL=https://www.digikey.com/en/products/detail/tdk-corporation/CGA4J1X8L1A106K125AC/9991388, Height max=1.5mm, Lead Spacing=0mm, Mounting Type=SM, MPN=CGA4J1X8L1A106K125AC, Size="2.00mm x 1.25mm"
C54 C57 C63 C66 C153: library part CMP-001-1982-2, "CAP CER 1UF 16V X8L 0603", Capacitance=1µF, Dielectric=X8L, Manufacturer="Murata Electronics", Op Temp max=150°C, Op Temp min=-55°C, Package="0603 (1608 Metric)", Ratings=AEC-Q200, Tolerance=10%, Voltage Rating=16V, ComponentLink1Description=Datasheet, ComponentLink1URL=https://www.murata.com/en-us/products/productdetail?partno=GCG188L8EE105KA07%23, ComponentLink2Description=Mouser, ComponentLink2URL=https://eu.mouser.com/ProductDetail/Murata-Electronics/GCG188L8EE105KA07D?qs=rrS6PyfT74dFMfTR80dVTA%3D%3D, ComponentLink3Description=Digikey, ComponentLink3URL=https://www.digikey.com/en/products/detail/murata-electronics/GCG188L8EE105KA07D/10695125, Height max=900µm, Lead Spacing=0mm, Mounting Type=SM, MPN=GCG188L8EE105KA07D, Size="1.60mm x 0.80mm"
C67 C68 C74 C75 C82 C83: library part CMP-001-2005-2, "CAP CER 4.7UF 100V X8L 1210", Capacitance=4.7µF, Dielectric=X8L, Manufacturer="Samsung Electro-Mechanics", Op Temp max=150°C, Op Temp min=-55°C, Package="1210 (3225 Metric)", Ratings=AEC-Q200, Tolerance=10%, Voltage Rating=100V, ComponentLink1Description=Datasheet, ComponentLink1URL=https://product.samsungsem.com/mlcc/CL32E475KCIVPJ.do, ComponentLink2Description=Mouser, ComponentLink2URL=https://eu.mouser.com/ProductDetail/Samsung-Electro-Mechanics/CL32E475KCIVPJE?qs=Imq1NPwxi77B1%252BqSJu7fiA%3D%3D, ComponentLink3Description=Digikey, ComponentLink3URL=https://www.digikey.com/en/products/detail/samsung-electro-mechanics/CL32E475KCIVPJE/20498500, Height max=2.3mm, Lead Spacing=0mm, Mounting Type=SM, MPN=CL32E475KCIVPJE, Size="3.20mm x 2.50mm"
C69 C70 C76 C77 C84 C85 C157 C159 C160 C162 C163 C168 C169 C173 C180 C183: library part CMP-001-2003-2, "CAP CER 0.1UF 100V X8L 0603", Capacitance=100nF, Dielectric=X8L, Manufacturer="Murata Electronics", Op Temp max=150°C, Op Temp min=-55°C, Package="0603 (1608 Metric)", Ratings=AEC-Q200, Tolerance=10%, Voltage Rating=100V, ComponentLink1Description=Datasheet, ComponentLink1URL=https://www.murata.com/en-us/products/productdetail?partno=GCJ188L8EL104KA07%23, ComponentLink2Description=Mouser, ComponentLink2URL=https://eu.mouser.com/ProductDetail/Murata-Electronics/GCJ188L8EL104KA07D?qs=rrS6PyfT74fTpbPMbkPm2A%3D%3D, ComponentLink3Description=Digikey, ComponentLink3URL=https://www.digikey.com/en/products/detail/murata-electronics/GCJ188L8EL104KA07D/11618648, Height max=900µm, Lead Spacing=0mm, Mounting Type=SM, MPN=GCJ188L8EL104KA07D, Size="1.60mm x 0.80mm"
C71 C72 C78 C79 C86 C87: library part CMP-001-2002-2, "CAP CER 0603 100PF 10V ULTRA STA", Capacitance=100pF, Dielectric=X8R, Manufacturer=KEMET, Op Temp max=150°C, Op Temp min=-55°C, Package="0603 (1608 Metric)", Ratings=AEC-Q200, Tolerance=10%, Voltage Rating=10V, ComponentLink1Description=Datasheet, ComponentLink1URL=https://www.kemet.com/en/us/product/C0603C101K8HACAUTO.html, ComponentLink2Description=Mouser, ComponentLink2URL=https://eu.mouser.com/ProductDetail/KEMET/C0603C101K8HACAUTO?qs=j%252B1pi9TdxUaad%2FlKIn1CPA%3D%3D, ComponentLink3Description=Digikey, ComponentLink3URL=https://www.digikey.com/en/products/detail/kemet/C0603C101K8HACAUTO/7957168, Height max=870µm, Lead Spacing=0mm, Mounting Type=SM, MPN=C0603C101K8HACAUTO, Size="1.60mm x 0.80mm"
C73 C80 C88: library part CMP-001-2004-3, "CAP CER 4.7UF 25V X8L 0805", Capacitance=4.7µF, Dielectric=X8L, Manufacturer="TDK Corporation", Op Temp max=150°C, Op Temp min=-55°C, Package="0805 (2012 Metric)", Ratings=AEC-Q200, Tolerance=10%, Voltage Rating=25V, ComponentLink1Description=Datasheet, ComponentLink1URL=https://product.tdk.com/en/search/capacitor/ceramic/mlcc/info?part_no=CGA4J1X8L1E475K125AC, ComponentLink2Description=Mouser, ComponentLink2URL=https://eu.mouser.com/ProductDetail/TDK/CGA4J1X8L1E475K125AC?qs=gZXFycFWdANxpKJOMQuJTA%3D%3D, ComponentLink3Description=Digikey, ComponentLink3URL=https://www.digikey.com/en/products/detail/tdk-corporation/CGA4J1X8L1E475K125AC/9991390, Height max=1.5mm, Lead Spacing=0mm, Mounting Type=SM, MPN=CGA4J1X8L1E475K125AC, Size="2.00mm x 1.25mm"
C89 C90 C97 C106 C116: library part CMP-001-2007-2, "CAP CER 0.033UF 50V X8L 0402", Capacitance=33nF, Dielectric=X8L, Manufacturer="Murata Electronics", Op Temp max=150°C, Op Temp min=-55°C, Package="0402 (1005 Metric)", Ratings=AEC-Q200, Tolerance=10%, Voltage Rating=50V, ComponentLink1Description=Datasheet, ComponentLink1URL=https://www.murata.com/en-us/products/productdetail?partno=GCM155L8EH333KE07%23, ComponentLink2Description=Mouser, ComponentLink2URL=https://eu.mouser.com/ProductDetail/Murata-Electronics/GCM155L8EH333KE07D?qs=rrS6PyfT74cZK6FfR7MiFw%3D%3D, ComponentLink3Description=Digikey, ComponentLink3URL=https://www.digikey.com/en/products/detail/murata-electronics/GCM155L8EH333KE07D/17845188, Height max=550µm, Lead Spacing=0mm, Mounting Type=SM, MPN=GCM155L8EH333KE07D, Size="1.00mm x 0.50mm"
C91 C98 C107: library part CMP-001-2006-2, "CAP CER 0402 1.5NF 16V ULTRA STA", Capacitance=1.5nF, Dielectric=X8R, Manufacturer=KEMET, Op Temp max=150°C, Op Temp min=-55°C, Package="0402 (1005 Metric)", Ratings=AEC-Q200, Tolerance=1%, Voltage Rating=16V, ComponentLink1Description=Datasheet, ComponentLink1URL=https://www.kemet.com/en/us/product/C0402C152F4HACAUTO.html, ComponentLink2Description=Mouser, ComponentLink2URL=https://eu.mouser.com/ProductDetail/KEMET/C0402C152F4HACAUTO?qs=j%252B1pi9TdxUbEW1hCqLU6QA%3D%3D, ComponentLink3Description=Digikey, ComponentLink3URL=https://www.digikey.com/en/products/detail/kemet/C0402C152F4HACAUTO/7955197?s=N4IgjCBcpgLFoDGUBmBDANgZwKYBoQB7KAbXAAYAOAdlgCYQBdAgBwBcoQBlNgJwEsAdgHMQAXwJgAbAhDJI6bPiKkQAZgCcYAKyUmrDpG58hoiSDraG0Oaky4CxSGTr0NaiMxDtOPASPECanJqWXlFBxVndTA6MHJtfW9DY38zSQ1KDTC7JUdVciZzOnJYbJtw%2B2UnMh1ycgACFgAxJJ8jAFVBfjYAeRQAWRw0LABXXhxAkABaayQoPlHq1UTGMWLVOvIWFCKgA, Height max=550µm, Lead Spacing=0mm, Mounting Type=SM, MPN=C0402C152F4HACAUTO, Size="1.00mm x 0.50mm"
C112 C122 C123 C129 C130 C131 C132 C197: library part CMP-00427-4, "DNP cap 0402", Capacitance=DNP, Package="0402 (1005 Metric)", Mounting Type=SM, MPN=DNP
C114 C115 C125 C134: library part CMP-001-2015-2, "CAP CER 0.47UF 50V X8L 0805", Capacitance=470nF, Dielectric=X8L, Manufacturer="TDK Corporation", Op Temp max=150°C, Op Temp min=-55°C, Package="0805 (2012 Metric)", Ratings=AEC-Q200, Tolerance=10%, Voltage Rating=50V, ComponentLink1Description=Datasheet, ComponentLink1URL=https://product.tdk.com/en/search/capacitor/ceramic/mlcc/info?part_no=CGA4J1X8L1H474K125AC, ComponentLink2Description=Mouser, ComponentLink2URL=https://eu.mouser.com/ProductDetail/TDK/CGA4J1X8L1H474K125AC?qs=W%2FMpXkg%252BdQ5d8zdfD6mokw%3D%3D, ComponentLink3Description=Digikey, ComponentLink3URL=https://www.digikey.com/en/products/detail/tdk-corporation/CGA4J1X8L1H474K125AC/12807037?s=N4IgjCBcoKxaBjKAzAhgGwM4FMA0IB7KAbRAGYYAWAdgA5KQBdfABwBcoQBlNgJwEsAdgHMQAX3xgG0EEkhoseQiRAAmMrWoamrDpG58hoieABs8WSgw58RSKTIBOMqsc6Q7TjwEjx%2BU24ycgo2yvYglAAMjpRg5sweegY%2BxviqMKoWwdZKdqSqlK5kEGmFztQgpa6xlWpllLTunvreRn7gjrSBiFaKtiqRTCaqkZTdlvI5-eGRAHQ0AAQArQBitTSRC4JrCc0gAKqC-GwA8sgAstiomACuvNjtALSZQVB8N7kqcPhujCaP4zk70%2B4QgfzEYiAA, Height max=1.45mm, Lead Spacing=0mm, Mounting Type=SM, MPN=CGA4J1X8L1H474K125AC, Size="2.00mm x 1.25mm"
C120 C137: library part CMP-001-2014-2, "CAP CER 330PF 16V X8R 0603", Capacitance=330pF, Dielectric=X8R, Manufacturer=KEMET, Op Temp max=150°C, Op Temp min=-55°C, Package="0603 (1608 Metric)", Ratings=-, Tolerance=5%, Voltage Rating=16V, ComponentLink1Description=Datasheet, ComponentLink1URL=https://www.kemet.com/en/us/product/C0603C331J4HACTU.html, ComponentLink2Description=Mouser, ComponentLink2URL=https://eu.mouser.com/ProductDetail/KEMET/C0603C331J4HACTU?qs=W0yvOO0ixfGIN%252BOCnjHNiQ%3D%3D, ComponentLink3Description=Digikey, ComponentLink3URL=https://www.digikey.com/en/products/detail/kemet/C0603C331J4HACTU/7946553?s=N4IgjCBcpgLFoDGUBmBDANgZwKYBoQB7KAbXAAYAOAdlgCYQBdAgBwBcoQBlNgJwEsAdgHMQAXwJ0ArA2ghkkdNnxFSIOvQCcAZgjMQ7TjwEjxBMJsqaE81JlwFikMuSYT15WNbkKlD1c4g2trkAAQsAGJMrByQIACqgvxsAPIoALI4aFgArrw4ZiAAtLJIUHw5Kk5kUiAE1ozuRd5lkBVVanpi3UA, Height max=870µm, Lead Spacing=0mm, Mounting Type=SM, MPN=C0603C331J4HACTU, Size="1.60mm x 0.80mm"
C127 C128 C138 C139: library part CMP-001-2016-2, "CAP CER 0.047UF 16V X8R 0402", Capacitance=47nF, Dielectric=X8R, Manufacturer="TDK Corporation", Op Temp max=150°C, Op Temp min=-55°C, Package="0402 (1005 Metric)", Ratings=AEC-Q200, Tolerance=10%, Voltage Rating=16V, ComponentLink1Description=Datasheet, ComponentLink1URL=https://product.tdk.com/en/search/capacitor/ceramic/mlcc/info?part_no=CGA2B3X8R1C473K050BB, ComponentLink2Description=Mouser, ComponentLink2URL=https://eu.mouser.com/ProductDetail/TDK/CGA2B3X8R1C473K050BB?qs=7GgVL%252Bg%252BDME3TQb%252Bbj%2FjaA%3D%3D, ComponentLink3Description=Digikey, ComponentLink3URL=https://www.digikey.com/en/products/detail/tdk-corporation/CGA2B3X8R1C473K050BB/3949531, Height max=550µm, Lead Spacing=0mm, Mounting Type=SM, MPN=CGA2B3X8R1C473K050BB, Size="1.00mm x 0.50mm"
C143 C205 C215 C225 C235: library part CMP-001-2011-2, "CAP CER 0402 560PF 16V ULTRA STA", Capacitance=560pF, Dielectric=X8R, Manufacturer=KEMET, Op Temp max=150°C, Op Temp min=-55°C, Package="0402 (1005 Metric)", Ratings=AEC-Q200, Tolerance=1%, Voltage Rating=16V, ComponentLink1Description=Datasheet, ComponentLink1URL=https://www.kemet.com/en/us/product/C0402C561F4HACAUTO.html, ComponentLink2Description=Mouser, ComponentLink2URL=https://eu.mouser.com/ProductDetail/KEMET/C0402C561F4HACAUTO?qs=j%252B1pi9TdxUZljUlO6hXHJQ%3D%3D, ComponentLink3Description=Digikey, ComponentLink3URL=https://www.digikey.com/en/products/detail/kemet/C0402C561F4HACAUTO/7955183?s=N4IgjCBcpgbFoDGUBmBDANgZwKYBoQB7KAbRAGYBOMAVgA4QBdAgBwBcoQBlNgJwEsAdgHMQAXwJgA7AhDJI6bPiKkQAFgBMGzfGYh2nHgJHiCGmhtnzFuAsUhltGyuQh6DkbnyGiJ4SnSUVqiYtioOIAAMTH4akWpB0HIhSnaqNLCRAAQsAGJMrByeAKqC-GwA8igAsjhoWACuvDimIAC0lknyfA3K9mQ0MbHpmSwoMUA, Height max=550µm, Lead Spacing=0mm, Mounting Type=SM, MPN=C0402C561F4HACAUTO, Size="1.00mm x 0.50mm"
C158 C161 C167 C177 C178 C179 C246 C247 C248 C249: library part CAP_1206_GCJ31CL8EL105KA07L, "CAP CER 1UF 100V X8L 1206", Capacitance=1µF, Dielectric=X8L, Manufacturer="Murata Electronics", Op Temp max=150°C, Op Temp min=-55°C, Package="1206 (3216 Metric)", Ratings=AEC-Q200, Tolerance=±10%, Voltage Rating=100V, Component Type="Ceramic Capacitor", ComponentLink1Description=Datasheet, ComponentLink1URL=https://www.murata.com/en-sg/api/pdfdownloadapi?cate=luCeramicCapacitorsSMD&partno=GCJ31CL8EL105KA07%23, ComponentLink3Description=Digikey, ComponentLink3URL=https://www.digikey.gr/en/products/detail/murata-electronics/GCJ31CL8EL105KA07L/11618584, ComponentLink4Description=Mouser, ComponentLink4URL=https://eu.mouser.com/ProductDetail/Murata-Electronics/GCJ31CL8EL105KA07L?qs=rrS6PyfT74eZHHvssdJSWA%3D%3D, Features="Soft Termination", Height max=1.90mm, Lead Spacing=-, Mounting Type=SM, MPN=GCJ31CL8EL105KA07L, Size="3.20mm x 1.60mm"
C164 C165 C166 C170 C171 C172 C175 C176 C184 C185 C186 C250 C251 C252: library part CAP_1210_GCM32EL8EF226KE08L, "CAP CER 22UF 25V X8L 1210", Capacitance="22 µF", Dielectric=X8L, Manufacturer="Murata Electronics", Op Temp max=150°C, Op Temp min=-55°C, Package="1210 (3225 Metric)", Ratings=AEC-Q200, Tolerance=±10%, Voltage Rating=25V, Component Type="Ceramic Capacitor", ComponentLink1Description=Datasheet, ComponentLink1URL=https://search.murata.co.jp/Ceramy/image/img/A01X/G101/ENG/GCM32EL8EF226KE08-01A.pdf, ComponentLink3Description=Digikey, ComponentLink3URL=https://www.digikey.gr/en/products/detail/murata-electronics/GCM32EL8EF226KE08L/10691974, ComponentLink4Description=Mouser, ComponentLink4URL=https://eu.mouser.com/ProductDetail/Murata-Electronics/GCM32EL8EF226KE08L?qs=rrS6PyfT74dnuZSDrFnfTA%3D%3D, Height max=2.85mm, Lead Spacing=-, Mounting Type=SM, MPN=GCM32EL8EF226KE08L, Size="3.20mm x 2.50mm"
D1 D2 D3 D4: library part CMP-001-0960-4, "DIODE SCHOTTKY 80V 500MA SOD123", Capacitance=15pF, Current - Average Rectified (Io)=500mA, Manufacturer="Diodes Incorporated", Op Temp max=175°C, Op Temp min=-55°C, Package=SOD-123, Voltage - DC Reverse (Vr) (Max)=80V, Voltage - Forward (Vf) (Max) @ If="800 mV @ 500 mA", ComponentLink1Description=Datasheet, ComponentLink1URL=https://mm.digikey.com/Volume0/opasdata/d220001/medias/docus/2174/MBR0580S1_R5.pdf, ComponentLink2Description=Mouser, ComponentLink2URL=https://eu.mouser.com/ProductDetail/Diodes-Incorporated/MBR0580S1-7?qs=jXf%2FRVhl83bQOuXZ5W6icQ%3D%3D, ComponentLink3Description=Digikey, ComponentLink3URL=https://www.digikey.com/en/products/detail/diodes-incorporated/MBR0580S1-7/5080335, Diode Type=Schottky, Height max=1.35mm, Mounting Type=SM, MPN=MBR0580S1-7, Reverse Recovery Time (trr)=0s, Size="3.65mm x 1.55mm"
D5: library part CMP-001-0248-5, "DIODE SCHOTTKY 40V 1A DO214AC", Capacitance=52pF, Current - Average Rectified (Io)=1A, Manufacturer="Micro Commercial Co", Op Temp max=125°C, Op Temp min=-55°C, Package="DO-214AC, SMA", Voltage - DC Reverse (Vr) (Max)=40V, Voltage - Forward (Vf) (Max) @ If="500 mV @ 1 A", ComponentLink1Description=Datasheet, ComponentLink1URL=https://www.mccsemi.com/pdf/Products/SS12-L-SS110-L(DO-214AC).pdf, ComponentLink2Description=Mouser, ComponentLink2URL=https://www2.mouser.com/ProductDetail/Micro-Commercial-Components-MCC/SS14-LTP?qs=%2Fha2pyFadujIpB0%252ByFcAqIT7YGlaGT7g1IJJK3bT00s%3D, ComponentLink3Description=Digikey, ComponentLink3URL=https://www.digikey.com/en/products/detail/micro-commercial-co/SS14-LTP/7652330?s=N4IgTCBcDaIMpwIwBYC0AZAKgBRAXQF8g, Diode Type=Schottky, Height max=2.44mm, Mounting Type=SM, MPN=SS14-LTP, Reverse Recovery Time (trr)=0s, Size=5.2x2.6
D6: library part CMP-001-1245-2, "TVS DIODE 5.5VWM 12VC SOT363", Cap @ Freq="0.5pF @ 1MHz", Manufacturer="Diodes Incorporated", Op Temp max=150°C, Op Temp min=-55°C, Package="6-TSSOP, SC-88, SOT-363", Ratings=-, Bidirectional Channels=-, ComponentLink1Description=Datasheet, ComponentLink1URL=https://www.diodes.com/assets/Datasheets/D5V0F4U6S.pdf, ComponentLink2Description=Mouser, ComponentLink2URL=https://eu.mouser.com/ProductDetail/Diodes-Incorporated/D5V0F4U6S-7?qs=L1DZKBg7t5HMc2d93K7aHQ%3D%3D, ComponentLink3Description=Digikey, ComponentLink3URL=https://www.digikey.com/en/products/detail/diodes-incorporated/D5V0F4U6S-7/7724995?s=N4IgTCBcDaICIFYBqAGAYgFgKoDYDKAtAOwgC6AvkA, Height max=1.1mm, Mounting Type=SM, MPN=D5V0F4U6S-7, P=200mW, Size="2.15mm x 2.1mm", Unidirectional Channels=4, Vbr=6V, Vc=12V, Vrwm=5.5V
D7: library part CMP-001-1211-3, "DIODE ZENER 10V 300MW SOD323", Current - Reverse Leakage @ Vr="500 nA @ 6 V", Manufacturer=onsemi, Op Temp max=150°C, Op Temp min=-65°C, Package="SC-76, SOD-323", Power=300mW, Tolerance=2%, Voltage - Forward (Vf) (Max) @ If="900 mV @ 10 mA", Voltage - Zener (Nom) (Vz)=10V, ComponentLink1Description=Datasheet, ComponentLink1URL=https://www.onsemi.com/pdf/datasheet/mm3z2v4st1-d.pdf, ComponentLink2Description=Mouser, ComponentLink2URL=https://eu.mouser.com/ProductDetail/onsemi/MM3Z10VST1G?qs=HVbQlW5zcXXzjT3ckAO0iA%3D%3D, ComponentLink3Description=Digikey, ComponentLink3URL=https://www.digikey.com/en/products/detail/on-semiconductor/MM3Z10VST1G/687052, Height max=1.1mm, Impedance (Max) (Zzt)=15, Mounting Type=SM, MPN=MM3Z10VST1G, Size="2.50mm x 1.25mm"
D8: "DIODE ARR SCHOTT 30V TO236AB", Current - Average Rectified (Io) (per Diode)=200mA, Current - Reverse Leakage @ Vr="2 µA @ 25 V", Manufacturer="Nexperia USA Inc.", Operating Temperature - Junction="150°C (Max)", Package / Case="TO-236-3, SC-59, SOT-23-3", Voltage - DC Reverse (Vr) (Max)="30 V", Voltage - Forward (Vf) (Max) @ If="800 mV @ 100 mA", ComponentLink1Description=DigiKey, ComponentLink1URL=https://www.digikey.bg/en/products/detail/nexperia-usa-inc/BAT54S-215/763218, ComponentLink2Description=Datasheet, ComponentLink2URL=https://assets.nexperia.com/documents/data-sheet/BAT54S.pdf, Diode Configuration="1 Pair Series Connection", Mounting Type=SM, MPN=BAT54S,215, Reverse Recovery Time (trr)="5 ns", Technology=Schottky
D9: library part LED_APT1608SEC/J3-AMT, "LED COOL WHITE DIFFUSED 0402 SMD", Colour=Red, Current - Test=20mA, Millicandela Rating=900mcd, Package / Case="0603 (1608 Metric)", Voltage=2.2V, ComponentLink1Description=Datasheet, ComponentLink1URL=https://www.kingbrightusa.com/images/catalog/SPEC/APT1608SEC-J3-AMT.pdf, ComponentLink2Description=DigiKey, ComponentLink2URL=https://www.digikey.lt/en/products/detail/kingbright/APT1608SEC-J3-AMT/17969025?s=N4IgTCBcDaIIIAUAqBGAbABgBwGUCiAwgPQBSAzALRwCySIAugL5A, ComponentLink3Description=Mouser, ComponentLink3URL=https://eu.mouser.com/ProductDetail/Kingbright/APT1608SEC-J3-AMT?qs=0pUdBCiL%2F4PrQrm2zkbL8w%3D%3D, Height (Max)=0.85mm, Lens style="Rectangle with Flat Top", Mnf=Kingbright, Mounting Type=SM, MPN=APT1608SEC/J3-AMT, Size / Dimension="1.60mm L x 0.85mm W", Viewing Angle=120°, Wavelength - Dominant=623nm
D10: library part CMP-001-1016-3, "DIODE ARRAY SCHOTTKY 30V SOT23-3", Capacitance @ Vr, F="10pF @ 1V, 1MHz", Current - Average Rectified=200mA, Current - Reverse Leakage @ Vr="4 µA @ 25 V", DC Forward voltage (Vf) (Max) @ If="1 V @ 100 mA", DC Reverse voltage (Vr) (Max)=30V, Manufacturer="Diodes Incorporated", Op Temp max=150°C, Op Temp min=-65°C, Package=SOT-23-3, ComponentLink1Description=Datasheet, ComponentLink1URL=https://www.diodes.com/assets/Datasheets/bat54srs.pdf, ComponentLink2Description=Mouser, ComponentLink2URL=https://eu.mouser.com/ProductDetail/Diodes-Incorporated/BAT54CTA?qs=vHuUswq2%252BsyCkAgsIRJkvw%3D%3D, ComponentLink3Description=Digikey, ComponentLink3URL=https://www.digikey.com/en/products/detail/diodes-incorporated/BAT54CTA/243043, Configuration="1 Pair Common Cathode", Diode Type=Schottky, Height max=1.15mm, Mounting Type=SM, MPN=BAT54CTA, Reverse Recovery Time (trr)=5ns, Size=2.9x2.4
FB1 FB2 FB3 FB4 FB5 FB6 FB7 FB8 FB9 FB10 FB11 FB12 FB13 FB14 FB15 FB16 FB17 FB18 FB19: library part CMP-001-1981-1, "FERRITE BEAD 220 OHM 0603 1LN", Frequency=100MHz, Manufacturer="Murata Electronics", Op Temp max=150°C, Op Temp min=-55°C, Package="0603 (1608 Metric)", Ratings=AEC-Q200, ComponentLink1Description=Datasheet, ComponentLink1URL=https://www.murata.com/en-us/products/productdata/8798137286686/QNFA9129.pdf, ComponentLink2Description=Mouser, ComponentLink2URL=https://eu.mouser.com/ProductDetail/Murata-Electronics/BLM18KG221BH1D?qs=sJ5gq5MLFXpgEHYBdWUtkQ%3D%3D, ComponentLink3Description=Digikey, ComponentLink3URL=https://www.digikey.com/en/products/detail/murata-electronics/BLM18KG221BH1D/6156000, DCR=50m, Height max=950µm, Imax=1.5A, Impedance=220, Lead Spacing=0mm, Mounting Type=SM, MPN=BLM18KG221BH1D, Number of Lines=1, Size="1.60mm x 0.80mm"
J1: library part CONN_TC2050_NL, "PLUG-OF-NAILS 10-PIN W/O LEGS 8\"", Manufacturer="Tag-Connect LLC", MPN=TC2050, ComponentLink1Description=Datasheet, ComponentLink1URL=https://www.tag-connect.com/wp-content/uploads/bsk-pdf-manager/TC2050-IDC-NL_Datasheet_8.pdf, ComponentLink2Description=DigiKey, ComponentLink2URL=https://www.digikey.pl/en/products/detail/tag-connect-llc/TC2030-IDC/4571121, Series=Plug-Of-Nails™
J2 J3 J4 J5 J6 J7: library part M50-3530442, "Connector Header Through Hole 4 position 0.050\" (1.27mm)", Manufacturer="METZ CONNECT USA Inc.", ComponentLink1Description=Datasheet, ComponentLink1URL=https://www.lcsc.com/datasheet/C3326047.pdf, ComponentLink2Description=DigiKey, ComponentLink2URL=https://www.digikey.com/en/products/detail/metz-connect-usa-inc/PR20B04VBNN/12342910, MPN=PR20B04VBNN